# Altium PCB ProPrj_Project Ignis_2026-06-03(1).PcbDoc (part 2 of 2)
Units mm, origin at the board's own origin, x right, y up, seen from the top; angles counter-clockwise.
Board outline 152.4 x 101.6 mm, 18 copper layers (F.Cu, F.Mask, B.Cu, B.Mask, F.SilkS, B.SilkS, F.Adhes, B.Adhes, F.Paste, B.Paste, Dwgs.User, Cmts.User, Eco1.User, Eco2.User, Edge.Cuts, Margin, B.CrtYd, F.CrtYd); 71 components, 0 nets, 328 pads, 147 vias.
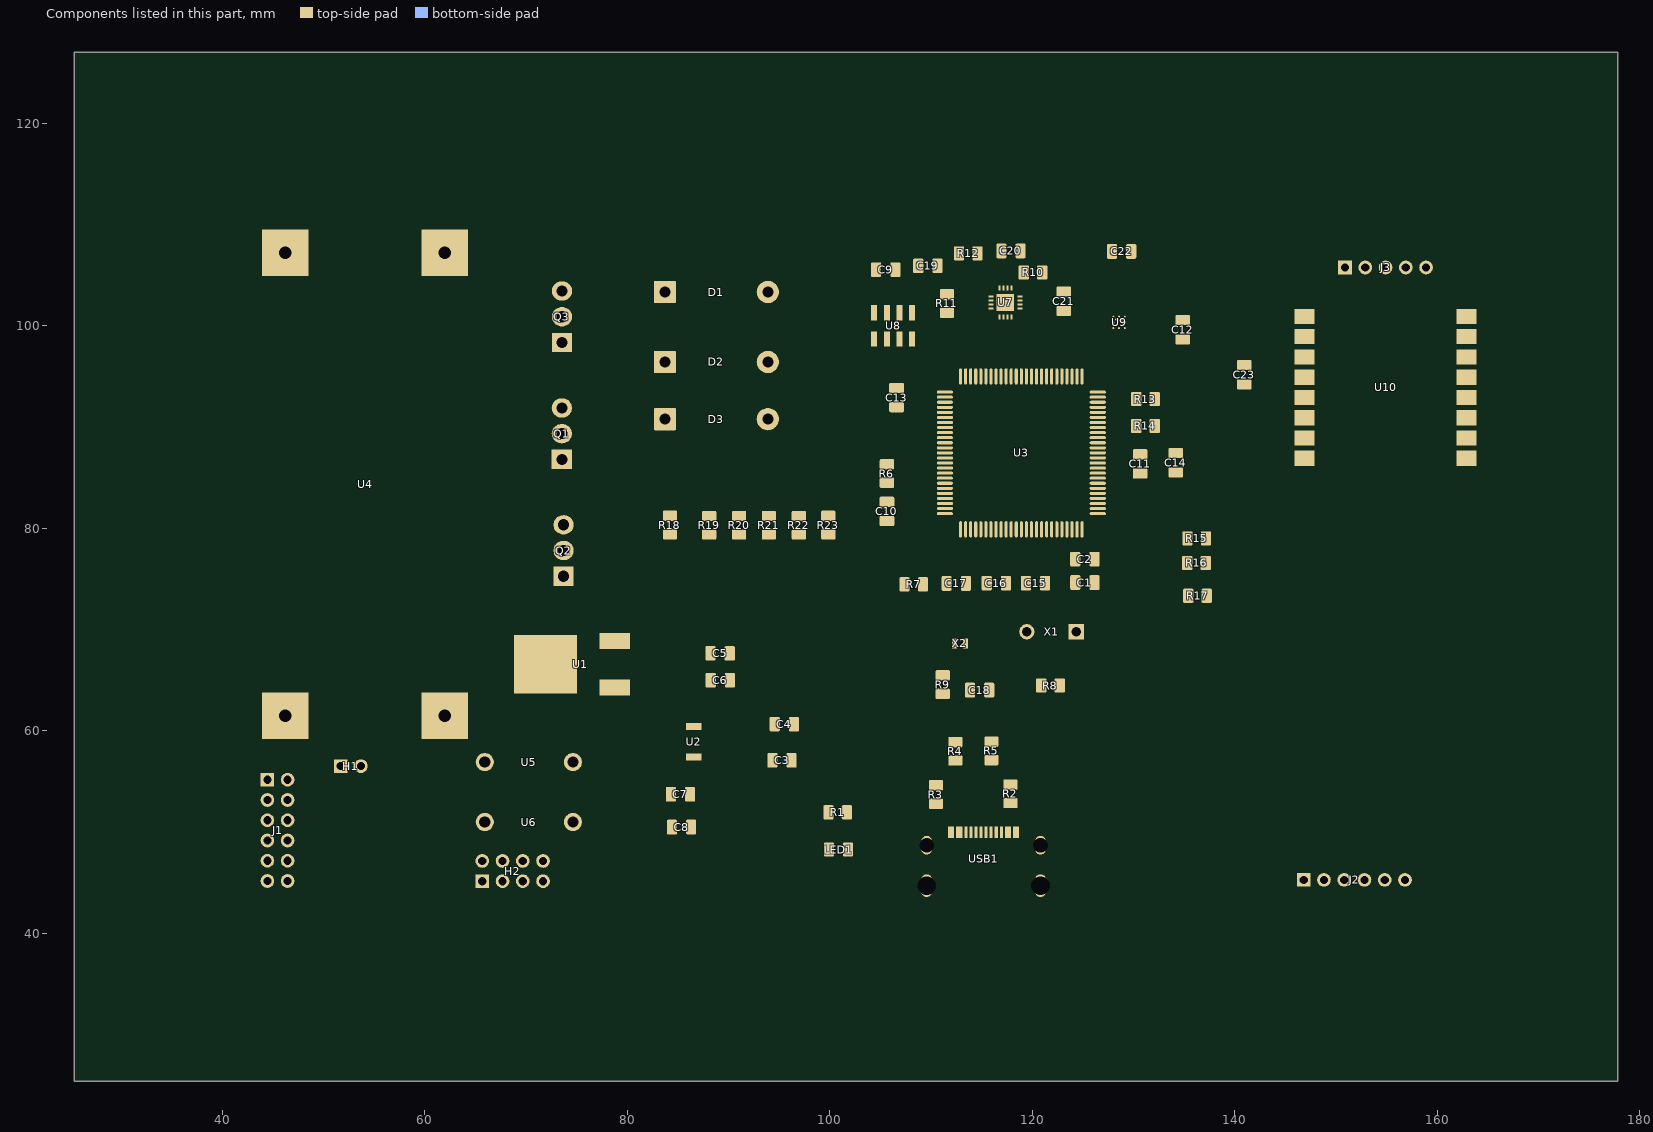
[diagram p8: the components of this part, seen from the top]

## Part data
C1 C2 C3 C4 C5 C6 C7 C8 C9 C10 C11 C12 C13 C14 C15 C16 C17 C18 C19 C20 C21 C22 C23: library part C_0805_2012Metric, "Capacitor SMD 0805 (2012 Metric), square (rectangular) end terminal, IPC-7351 nominal, (Body size source: IPC-SM-782 page 76, https://www.pcb-3d.com/wordpress/wp-content/uploads/ipc-sm-782a_amendment_1_and_2.pdf, https://docs.google.com/spreadsheets/d/1BsfQQcO9C6DZCsRaXUlFlo91Tg2WpOkGARC1WS5S8t0/edit?usp=sharing)", KiLib_Generator=SMD_2terminal_chip_molded
D1 D2 D3: library part D_DO-41_SOD81_P10.16mm_Horizontal, "Diode, DO-41_SOD81 series, Axial, Horizontal, pin pitch=10.16mm, length*diameter=5.2*2.7mm^2, https://www.diodes.com/assets/Package-Files/DO-41-Plastic.pdf", Datasheet=http://www.vishay.com/docs/88503/1n4001.pdf, Description="1000V 1A General Purpose Rectifier Diode, DO-41", KiLib_Generator=diode/THT, Sim.Device=D, Sim.Pins="1=K 2=A", ki_fp_filters=D*DO?41*
H1: library part PinHeader_1x02_P2.00mm_Vertical, "Through hole straight pin header, 1x02, 2.00mm pitch, single row", Manufacturer Part=PZ254V-11-02P, Manufacturer=XFCN(兴飞), LCSC Part Name="1x2P 间距:2.54mm 方针 直插", Datasheet=https://item.szlcsc.com/datasheet/PZ254V-11-02P/502957.html, Description="Pin Structure:1x2P Pitch:2.54mm Row Spacing:- Circluar Pins/Square Pins:Pin Header Mounting Type:Through Hole Number of Rows:1 Number of Pins:2P Current Rating:3A Voltage Rating (Max):250V Length of Mating Pin:6mm Insulation Height:2.5mm Length of End Con", KiLib_Generator=connector/pin_header_socket, Supplier Part=C492401, Supplier=LCSC
H2: library part PinHeader_2x04_P2.00mm_Vertical, "Through hole straight pin header, 2x04, 2.00mm pitch, double rows", Manufacturer Part=PZ254V-12-8P, Manufacturer=XFCN(兴飞), LCSC Part Name="2x4P 间距:2.54mm 方针 直插", Datasheet=https://item.szlcsc.com/datasheet/PZ254V-12-8P/502977.html, Description="Pin Structure:2x4P Pitch:2.54mm Row Spacing:2.54mm Circluar Pins/Square Pins:Pin Header Mounting Type:Through Hole Number of Rows:2 Number of Pins:8P Current Rating:- Voltage Rating (Max):- Length of Mating Pin:6mm Insulation Height:2.5mm Length of End Co", KiLib_Generator=connector/pin_header_socket, Supplier Part=C492421, Supplier=LCSC
J1: library part PinHeader_2x06_P2.00mm_Vertical, "Through hole straight pin header, 2x06, 2.00mm pitch, double rows", Description="Generic connector, double row, 02x06, top/bottom pin numbering scheme (row 1: 1...pins_per_row, row2: pins_per_row+1 ... num_pins), script generated (kicad-library-utils/schlib/autogen/connector/)", KiLib_Generator=connector/pin_header_socket, ki_fp_filters=Connector*:*_2x??_*
J2: library part PinHeader_1x06_P2.00mm_Vertical, "Through hole straight pin header, 1x06, 2.00mm pitch, single row", Description="Generic connector, single row, 01x06, script generated", KiLib_Generator=connector/pin_header_socket, ki_fp_filters=Connector*:*_1x??_*
J3: library part PinHeader_1x05_P2.00mm_Vertical, "Through hole straight pin header, 1x05, 2.00mm pitch, single row", Description="Generic connector, single row, 01x05, script generated", KiLib_Generator=connector/pin_header_socket, ki_fp_filters=Connector*:*_1x??_*
LED1: library part LED_0805_2012Metric, "LED SMD 0805 (2012 Metric), square (rectangular) end terminal, IPC-7351 nominal, (Body size source: https://docs.google.com/spreadsheets/d/1BsfQQcO9C6DZCsRaXUlFlo91Tg2WpOkGARC1WS5S8t0/edit?usp=sharing)", KiLib_Generator=SMD_2terminal_chip_molded
Q1 Q2 Q3: library part TO-220-3_Vertical, "TO-220-3, Vertical, RM 2.54mm, see https://www.vishay.com/docs/66542/to-220-1.pdf", Datasheet=http://www.irf.com/product-info/datasheets/data/irlz44n.pdf, Description="47A Id, 55V Vds, 22mOhm Rds Single N-Channel HEXFET Power MOSFET, TO-220AB", KiLib_Generator=package/TO_SOT/THT, ki_fp_filters=TO?220*
R1 R2 R3 R4 R5 R6 R7 R8 R9 R10 R11 R12 R13 R14 R15 R16 R17 R18 R19 R20 R21 R22 R23: library part R_0805_2012Metric, "Resistor SMD 0805 (2012 Metric), square (rectangular) end terminal, IPC-7351 nominal, (Body size source: IPC-SM-782 page 72, https://www.pcb-3d.com/wordpress/wp-content/uploads/ipc-sm-782a_amendment_1_and_2.pdf)", KiLib_Generator=SMD_2terminal_chip_molded
  R18 R19 R20 R21 R22 R23: Description=Resistor
U1: library part TO-252-2_L6.6-W5.6-P2.3-LS9.7, JLC_3DModel_Q=eec660cf81bf4a74bb3c7ab29ad977d9, JLC_3D_Size="6.6 9.7", Manufacturer Part=AMS1117-3.3, Manufacturer=YONGYUTAI(永裕泰), Datasheet=https://item.szlcsc.com/datasheet/AMS1117-3.3/43231650.html, Description="Output Type:Fixed Voltage - Supply:15V Output Voltage:3.3V Output Voltage:3.3V Output Current:800mA Power Supply Rejection Ratio (PSRR):75dB@(120Hz) Voltage Dropout:1.25V@(1A) standby current:- Noise:0.003%Vout Features:Over Current Protection；Over Temper", Supplier Part=C41414107, Supplier=LCSC, LCSC Part Name=AMS1117-3.3
U2: library part SOT-89-3_L4.5-W2.4-P1.50-LS4.0-BR, JLC_3DModel_Q=3e173860bf1340a4970e0d4da7c38a29, JLC_3D_Size="4.5 4.1", Manufacturer Part=AMS1117-5.0, Manufacturer=KUU, Datasheet=https://item.szlcsc.com/datasheet/AMS1117-5.0/44309945.html, Description="Output Type:Fixed Voltage - Supply:12V Output Voltage:5V Output Voltage:5V Output Current:800mA Power Supply Rejection Ratio (PSRR):- Voltage Dropout:1.3V@(0.8A) standby current:2mA Noise:0.003%Vout Features:Thermal Shutdown Operating Temperature:-40°C~+85", Supplier Part=C42387175, Supplier=LCSC, LCSC Part Name=AMS1117-5.0
U3: library part LQFP-100_L14.0-W14.0-P0.50-LS16.0-BL, JLC_3DModel_Q=dcc1c7ac602c4975b215b1407bde4684, JLC_3D_Size="16 16", Manufacturer Part=STM32G473VET6, Manufacturer=ST(意法半导体), LCSC Part Name="带DSP和FPU的170MHz主流ARM Cortex-M4 MCU，具有512 KB Flash存储器、数学加速器和高模拟电平集成", Datasheet=https://item.szlcsc.com/datasheet/STM32G473VET6/778077.html, Description="CPU Core:ARM-M4 CPU Maximum Speed:170MHz Program Storage Size:512KB Program Memory Type:FLASH Number of I/O:86 ADC (Bit):12bit DAC (Bit):12bit Voltage - Supply:1.71V~3.6V Voltage - Supply:1.71V~3.6V Applications:-", Supplier Part=C730122, Supplier=LCSC
U4: library part DC_DC_LM2596_small
U5 U6: library part DO-41_BD2.4-L4.7-P8.70-D0.8-FD, JLC_3DModel_Q=39d8e4572d564e62a86d2224fc908dd8, JLC_3D_Size="9.5 2.3985", Manufacturer Part=IN5819, Supplier Part=C9900005587, Supplier=LCSC, LCSC Part Name=IN5819
U7: library part QFN-24_L3.0-W3.0-P0.40-BL-EP, JLC_3DModel_Q=45d28e8706e7498c95f25f3d412d7c49, JLC_3D_Size="3 3", Manufacturer Part=MPU-6500, Manufacturer="TDK InvenSense(应美盛)", Datasheet=https://item.szlcsc.com/datasheet/MPU-6500/51287.html, Description="Accelerometer Sensing Axis:X,Y,Z Acceleration Measurement Range (MAX):±16g Acceleration Measurement Range (MAX):±16g Gyroscope Sensing Axis:X,Y,Z Gyroscope Measurement Range (MAX):±2000dps Gyroscope Measurement Range (MAX):±2000dps Sensor Type:IMU (accele", Supplier Part=C50278, Supplier=LCSC, LCSC Part Name=MPU-6500
U8: library part SENSORS-SMD_MS5611-01BA03, JLC_3DModel_Q=672fc546baaf493a9f668044721589aa, JLC_3D_Size="5 3", Manufacturer Part=MS561101BA03-50, Manufacturer="TE Connectivity(泰科电子)", LCSC Part Name=气压传感器，带不锈钢帽, Datasheet=https://item.szlcsc.com/datasheet/MS561101BA03-50/16320.html, Description="Pressure range:1Kpa~1.2bar Pressure range:1Kpa~1.2bar Voltage - Supply:1.8V~3.6V Voltage - Supply:1.8V~3.6V Standby Current:140nA Interface:SPI；I2C Module:Yes Absolute Accuracy:150pa Relative Accuracy:- Features:On-chip temperature output；Standby mode；Int", Supplier Part=C15639, Supplier=LCSC
U9: library part WLCSP-12_L1.6-W1.6_BMM150, JLC_3DModel_Q=e29c6614a3ad4a06ae6fc9d5a7a1f09f, JLC_3D_Size="1.56 1.56", Manufacturer Part=BMM150, Manufacturer=Bosch(博世), LCSC Part Name="三轴地磁式传感器 停产", Datasheet=https://item.szlcsc.com/datasheet/BMM150/183067.html, Description="Magnetic Sensing Range(X,Y):±1.3mT Magnetic Sensing Range(X,Y):±1.3mT Magnetic Sensing Range(Z):±2.5mT Magnetic Sensing Range(Z):±2.5mT Output bit:- Interface Type:SPI；I2C Voltage - Supply:1.62V~3.6V Voltage - Supply:1.62V~3.6V Current - Supply:- Operatin", Supplier Part=C171681, Supplier=LCSC
U10: library part Ai-Thinker-Ra-01-LoRa, "Ai Thinker Ra-01 LoRa", Datasheet=http://wiki.ai-thinker.com/_media/lora/docs/c048ps01a1_ra-02_product_specification_v1.1.pdf, Description="Ai-Thinker Ra-02 410-525 MHz LoRa Module, SPI interface, U.FL antenna connector", ki_fp_filters=Ai?Thinker?Ra?01*
USB1: library part TE_2340901-1, Manufacturer Part=USBC1-AF-046, Manufacturer=CHIN-BAN(勤本), LCSC Part Name="Type-C 母 沉板", Datasheet=https://item.szlcsc.com/datasheet/USBC1-AF-046/52896317.html, Description="Connector Type:Type-C Protocol Standard:USB 3.1 Gender:Female Mounting Type:Recessed Mount Number of Contacts:16P Number of Ports:1 Current Rating-Power:5A Connect-Disconnect Life:10,000 Cycles Length:6.5mm Detection color:Black Operating Temperature:-30°C", Supplier Part=C50305660, Supplier=LCSC
X1: library part HC-49US_L11.5-W4.5-P4.88, JLC_3DModel_Q=a8e34f6c394c4d60ace7720f62d1ccdf, JLC_3D_Size="10.9855 4.501", Manufacturer Part=6BS08000F20UCG, Manufacturer=SJK(晶科鑫), LCSC Part Name="8MHz ±20ppm 20pF", Datasheet=https://atta.szlcsc.com/upload/public/pdf/source/20220727/A799E7302D7A178404B6CABC66F8558B.pdf, Description="Crystal Type: Frequency: Frequency Tolerance: Frequency Tolerance: Frequency Stability:±30ppm Frequency Stability:±30ppm Load Capacitance: Operating Temperature: Operating Temperature:", Supplier Part=C252288, Supplier=LCSC
X2: library part ABS0532768KHZ6T, "ABS05-32.768KHZ-6-T-2", Manufacturer Part=9H03200028, Manufacturer=TXC(台湾晶技), LCSC Part Name="32.768kHz ±20ppm 7pF", Datasheet=https://atta.szlcsc.com/upload/public/pdf/source/20200108/C409339_4C8718E4B1BEC1560F6B97CF419D35BF.pdf, Description="Crystal Type:SMD Crystal Resonator Frequency: Frequency Tolerance: Frequency Tolerance: Load Capacitance: Equivalent Series Resistance (ESR):90kΩ Operating Temperature: Operating Temperature:", Supplier Part=C409339, Supplier=LCSC

## Via types
v1: diameter 0.6, hole 0.3, F.Cu to B.Cu, tented both sides, 147 vias

## Nets (pads, with @x,y where several pads share a name; then routed paths per layer and width w, separated by ;. In a path a pad name is that pad's centre, name@x,y a point inside that pad or via, vN(x,y) a via of type N, cw(c..) or ccw(c..) an arc to the next point about the centre after c; other vN are vias at no path point)
pads on no net: C1.1 C1.2 C2.1 C2.2 C3.1 C3.2 C4.1 C4.2 C5.1 C5.2 C6.1 C6.2 C7.1 C7.2 C8.1 C8.2 C9.1 C9.2 C10.1 C10.2 C11.1 C11.2 C12.1 C12.2 C13.1 C13.2 C14.1 C14.2 C15.1 C15.2 C16.1 C16.2 C17.1 C17.2 C18.1 C18.2 C19.1 C19.2 C20.1 C20.2 C21.1 C21.2 C22.1 C22.2 C23.1 C23.2 D1.1 D1.2 D2.1 D2.2 D3.1 D3.2 H1.1 H1.2 H2.1 H2.2 H2.3 H2.4 H2.5 H2.6 H2.7 H2.8 J1.1 J1.2 J1.3 J1.4 J1.5 J1.6 J1.7 J1.8 J1.9 J1.10 J1.11 J1.12 J2.1 J2.2 J2.3 J2.4 J2.5 J2.6 J3.1 J3.2 J3.3 J3.4 J3.5 LED1.1 LED1.2 Q1.1 Q1.2 Q1.3 Q2.1 Q2.2 Q2.3 Q3.1 Q3.2 Q3.3 R1.1 R1.2 R2.1 R2.2 R3.1 R3.2 R4.1 R4.2 R5.1 R5.2 R6.1 R6.2 R7.1 R7.2 R8.1 R8.2 R9.1 R9.2 R10.1 R10.2 R11.1 R11.2 R12.1 R12.2 R13.1 R13.2 R14.1 R14.2 R15.1 R15.2 R16.1 R16.2 R17.1 R17.2 R18.1 R18.2 R19.1 R19.2 R20.1 R20.2 R21.1 R21.2 R22.1 R22.2 R23.1 R23.2 U1.1 U1.2 U1.3 U2.1 U2.3 U3.1 U3.2 U3.3 U3.4 U3.5 U3.6 U3.7 U3.8 U3.9 U3.10 U3.11 U3.12 U3.13 U3.14 U3.15 U3.16 U3.17 U3.18 U3.19 U3.20 U3.21 U3.22 U3.23 U3.24 U3.25 U3.26 U3.27 U3.28 U3.29 U3.30 U3.31 U3.32 U3.33 U3.34 U3.35 U3.36 U3.37 U3.38 U3.39 U3.40 U3.41 U3.42 U3.43 U3.44 U3.45 U3.46 U3.47 U3.48 U3.49 U3.50 U3.51 U3.52 U3.53 U3.54 U3.55 U3.56 U3.57 U3.58 U3.59 U3.60 U3.61 U3.62 U3.63 U3.64 U3.65 U3.66 U3.67 U3.68 U3.69 U3.70 U3.71 U3.72 U3.73 U3.74 U3.75 U3.76 U3.77 U3.78 U3.79 U3.80 U3.81 U3.82 U3.83 U3.84 U3.85 U3.86 U3.87 U3.88 U3.89 U3.90 U3.91 U3.92 U3.93 U3.94 U3.95 U3.96 U3.97 U3.98 U3.99 U3.100 U4.1 U4.2 U4.3 U4.4 U5.1 U5.2 U6.1 U6.2 U7.2 U7.3 U7.4 U7.5 U7.8 U7.9 U7.10 U7.11 U7.14 U7.15 U7.16 U7.17 U7.20 U7.21 U7.22 U7.23 U7.25 U8.1 U8.2 U8.3 U8.4 U8.5 U8.6 U8.7 U8.8 U9.A1 U9.A3 U9.A5 U9.B2 U9.B4 U9.C1 U9.C5 U9.D2 U9.D4 U9.E1 U9.E3 U9.E5 U10.1 U10.2 U10.3 U10.4 U10.5 U10.6 U10.7 U10.8 U10.9 U10.10 U10.11 U10.12 U10.13 U10.14 U10.15 U10.16 USB1.A1/B12 USB1.A4/B9 USB1.A5 USB1.A6 USB1.A7 USB1.A8 USB1.B1/A12 USB1.B4/AP USB1.B5 USB1.B6 USB1.B7 USB1.B8 USB1.SH1 USB1.SH2 USB1.SH3 USB1.SH4 X1.1 X1.2 X2.1 X2.2
copper on no net: | length 3153.2
  F.Cu w0.1: v1(111.394,104.518) 113.318,104.518 114.934,102.902 115.907,102.902 ; 111.562,103.108 114.304,103.108 114.91,102.502 115.907,102.502 ; v1(113.02,101.542) 113.181,101.702 115.907,101.702 ; v1(114.316,102.318) 114.532,102.102 115.907,102.102 ; 116.295,99.706 116.335,99.746 116.335,100.874 ; v1(116.495,77.952) 117.368,77.952 118.412,78.996 118.412,79.896 ; v1(117.405,65.702) 117.405,64.622 118.161,63.866 v1(119.8,63.866) ; 118.335,100.874 118.44,100.77 118.44,100.317 118.665,100.092 118.965,100.392 119.533,100.392 119.783,100.142 121.495,100.142 ; 118.763,101.302 119.25,101.302 v1(119.616,100.936) ; 118.763,101.702 119.274,101.702 119.49,101.486 120.151,101.486 121.495,100.142 ; 118.763,102.502 119.215,102.502 119.888,101.829 120.211,101.829 v1(120.41,102.028) ; 118.763,102.902 119.495,102.902 119.935,103.342 119.945,103.342 v1(120.006,103.28) ; 118.763,103.302 118.925,103.302 v1(119.595,103.972) ; v1(119.305,99.842) 121.069,99.842 v1(121.325,99.586) ; 123.112,101.466 121.788,100.142 121.495,100.142 ; v1(126.25,100.436) 126.364,100.323 127.993,100.323 ; v1(126.53,101.185) 126.53,101.177 126.525,101.172 126.905,100.592 128.276,100.606 ; 127.325,102.385 127.325,101.557 127.993,100.889 ; 128.559,99.757 128.634,99.682 129.05,99.682 129.125,99.757 129.205,99.837 129.205,99.852 ; 128.559,100.889 129.045,101.375 v1(129.045,101.785) ; 129.125,100.323 129.205,100.243 129.205,99.852 ; 129.125,100.889 130.492,100.889 130.825,101.222 ; v1(131.592,99.255) 130.995,99.852 129.205,99.852 ; v1(133.875,105.982) 134.805,106.912 157.715,106.912 158.875,105.752
  F.Cu w0.2: 44.465,45.172 43.488,46.149 43.488,50.195 44.465,51.172 ; 44.465,53.172 46.465,51.172 48.791,48.846 69.42,48.846 72.811,52.237 75.126,52.237 75.837,51.526 75.837,49.848 ; 46.237,61.482 48.825,61.482 51.412,58.894 68.362,58.894 v1(71.622,55.634) 72.9,56.912 74.635,56.912 ; 46.237,107.202 48.825,107.202 51.412,109.79 v1(72.198,109.79) ; 51.695,56.512 52.672,56.512 52.672,56.146 54.058,54.759 v1(66.604,54.759) ; v1(53.493,50.119) 54.106,49.507 v1(68.82,49.507) 71.951,52.638 84.302,52.638 ; v1(53.672,64.623) 54.205,64.09 v1(58.066,64.09) 60.548,66.572 71.925,66.572 71.925,69.774 76.617,74.466 107.382,74.466 107.476,74.56 107.476,77.591 106.193,78.874 106.193,80.164 106.193,79.29 106.128,79.225 v1(105.624,79.225) ; 53.695,56.512 55.154,57.971 v1(58.717,57.971) 58.815,58.069 v1(62.016,58.069) ; v1(54.312,47.206) 57.343,44.175 68.662,44.175 ; v1(58.246,78.971) 63.301,84.026 90.608,84.026 99.528,92.946 111.362,92.946 ; 61.985,107.202 102.821,107.202 ; 65.685,45.152 66.662,45.152 66.662,45.518 67.272,46.129 68.09,46.129 68.662,45.557 68.662,44.175 ; v1(71.335,91.588) 74.411,94.663 109.043,94.663 110.26,93.446 111.362,93.446 ; 71.685,47.152 73.141,47.152 75.837,49.848 ; v1(74.001,61.113) 74.684,60.43 86.565,60.43 ; 74.635,50.992 72.144,50.992 68.708,47.556 68.708,46.748 69.281,46.175 74.557,46.175 v1(77.605,49.223) 78.554,48.274 99.925,48.274 100.817,49.165 v1(100.817,50.343) ; v1(78.672,66.08) 87.355,66.08 88.222,65.213 ; 78.772,64.272 80.574,64.272 80.91,63.936 89.079,63.936 90.142,64.999 94.482,60.659 ; 78.773,68.872 78.815,68.83 v1(78.815,68.034) ; 87.872,52.059 86.312,50.499 85.28,49.468 80.884,49.468 80.503,49.848 75.837,49.848 ; 88.242,64.999 88.232,65.009 ; 88.242,64.999 88.232,65.009 ; v1(88.409,58.812) 88.291,58.929 83.852,58.929 84.302,58.479 84.302,53.729 84.302,52.638 ; 90.142,64.999 90.142,67.629 90.132,67.639 ; v1(91.513,67.789) 94.561,70.838 125.209,70.838 125.44,70.607 v1(151.759,70.607) ; 94.332,57.079 93.981,57.43 ; 94.562,60.659 94.482,60.659 ; 96.232,57.079 96.462,57.309 96.462,60.659 101.479,60.659 v1(105.624,64.805) ; v1(100.972,98.206) 102.2,96.977 v1(105.902,96.977) 109.788,96.977 v1(112.016,94.749) 112.016,94.603 112.725,93.894 112.912,93.894 112.912,94.996 ; 101.693,51.954 101.8,51.846 101.8,48.674 ; 101.8,48.274 101.8,48.474 ; v1(102.798,98.223) 103.397,97.624 104.382,97.624 104.382,98.676 104.382,101.276 104.382,103.565 105.335,104.518 105.505,104.518 ; v1(104.185,83.542) 104.661,83.542 105.922,82.281 105.977,82.281 ; v1(105.007,103.331) 105.007,100.371 105.651,99.727 106.882,99.727 ; v1(105.011,93.86) 105.015,93.856 106.592,93.856 ; 105.632,84.496 106.182,83.946 111.362,83.946 ; 105.642,82.616 105.977,82.281 ; 106.193,80.165 105.642,80.716 109.53,80.716 110.26,81.446 111.362,81.446 112.464,81.446 112.693,81.216 ; 106.475,105.532 106.475,104.942 106.899,104.518 109.362,104.518 ; 106.592,91.956 105.632,90.996 105.632,86.321 105.674,86.278 v1(108.75,86.278) ; 106.882,98.676 106.882,99.727 ; 106.882,101.276 108.251,101.276 ; v1(107.521,48.745) 102.951,44.175 68.662,44.175 ; 108.132,98.676 108.132,97.624 112.1,97.624 v1(112.724,98.248) ; 108.132,101.276 108.251,101.276 ; 108.735,105.912 108.115,106.532 108.115,107.202 ; 109.207,74.466 109.207,74.491 109.545,74.829 v1(109.545,76.052) 109.545,76.765 110.142,77.362 116.129,77.362 116.649,76.842 117.26,76.842 119.412,78.994 119.412,79.896 ; 110.485,52.798 112.42,50.864 113.935,50.864 113.935,49.987 ; 110.485,54.623 110.214,54.351 ; 110.635,105.912 110.635,105.277 v1(111.394,104.518) 109.362,104.518 ; 111.152,63.656 111.522,64.026 113.842,64.026 113.842,66.088 115.543,67.789 ; 111.152,65.481 111.689,66.017 111.689,68.631 112.39,68.631 113.973,70.214 v1(115.731,70.214) ; 111.362,81.946 106.312,81.946 105.977,82.281 ; 111.362,85.446 113.36,85.446 116.594,88.68 v1(120.315,88.68) ; 111.542,74.556 113.748,76.762 v1(115.88,76.762) ; 111.562,101.283 110.495,100.217 106.459,100.217 105.632,101.043 105.632,101.276 105.632,102.327 105.632,104.391 105.505,104.518 102.821,107.202 ; 112.398,57.066 113.409,58.077 113.409,59.388 112.847,59.95 v1(112.767,59.95) ; v1(112.756,100.132) 113.182,99.706 116.295,99.706 v1(117.272,99.706) ; 113.365,107.751 111.684,107.751 111.135,107.202 108.115,107.202 ; 113.412,94.996 113.412,96.097 113.857,96.543 125.692,96.543 126.716,95.519 126.716,95.036 ; 113.442,74.556 115.462,74.556 115.492,74.586 116.52,73.558 120.234,73.558 121.262,74.586 124.182,74.586 124.242,74.646 124.242,76.526 123.812,76.956 ; v1(113.716,106.078) 113.716,106.277 114.585,107.145 ; v1(113.778,93.037) 113.912,93.171 113.912,94.996 ; v1(113.787,56.975) 113.787,57.242 115.477,58.933 115.955,58.933 ; 114,68.631 114.701,68.631 115.543,67.789 ; 114.412,94.996 114.412,92.56 v1(114.741,92.231) ; 114.435,49.987 114.435,52.242 115.935,53.742 ; v1(114.665,57.242) 114.799,57.108 115.955,57.108 ; 114.912,94.996 114.912,93.894 117.469,93.894 v1(117.687,93.676) ; 114.935,49.987 115.435,49.987 v1(115.285,51.912) ; 115.412,79.896 115.412,80.997 112.912,80.997 112.693,81.216 ; 115.412,94.996 115.412,96.097 125.186,96.097 v1(125.76,95.523) ; v1(115.505,83.302) 117.478,85.275 v1(123.253,85.275) 123.924,85.946 126.462,85.946 ; 115.742,64.026 116.181,64.026 v1(117.739,62.468) ; 115.935,49.987 115.935,53.742 ; v1(116.356,55.694) 112.249,55.694 111.355,56.587 111.355,57.848 111.876,58.369 ; v1(116.393,53.972) 116.165,53.972 115.935,53.742 ; 116.412,79.896 116.412,81.895 117.057,82.54 v1(117.596,82.54) ; 116.912,79.896 116.912,81.432 v1(117.095,81.615) ; 116.935,49.987 116.935,51.737 117.835,52.637 117.835,52.868 ; 116.942,107.386 116.942,106.776 v1(118.412,105.306) 118.826,105.306 ; v1(116.991,60.567) 112.475,60.567 107.89,55.982 107.89,54.125 ; v1(117.375,67.789) 115.543,67.789 ; 117.392,74.586 117.392,75.869 v1(118.873,77.35) ; v1(118.12,81.494) 118.617,80.997 118.912,80.997 118.912,79.896 ; 118.412,94.996 118.412,93.894 119.86,92.446 126.462,92.446 127.894,92.446 v1(128.694,93.246) ; 118.912,94.996 118.912,94.203 119.982,93.132 v1(124.018,93.132) ; v1(119.033,76.354) 119.635,76.956 123.812,76.956 ; 119.155,105.261 119.11,105.306 118.826,105.306 ; 119.362,74.586 119.362,74.802 v1(120.312,75.752) v1@120.459,75.899 ; v1(119.8,63.866) 120.41,64.476 120.879,64.476 120.879,68.358 119.452,69.786 122.47,69.786 v1(122.907,70.223) ; 119.912,79.896 119.912,78.794 120.446,78.26 v1(123.932,78.26) ; v1(120.774,103.054) 120.894,102.934 120.894,102.481 121.12,102.254 121.335,102.254 122.446,103.366 123.112,103.366 ; v1(121.305,103.652) 121.888,103.652 121.955,103.719 121.955,103.852 ; v1(121.462,105.526) 121.244,105.526 121.012,105.294 ; v1(121.909,101.898) 121.815,101.991 121.815,102.154 122.077,102.416 124.776,102.416 125.438,103.077 130.674,103.077 131.101,102.651 151.774,102.651 154.875,105.752 ; 122.705,64.476 124.334,66.105 124.334,69.786 ; 123.112,101.466 123.274,101.466 v1(124.161,100.579) ; v1(123.182,99.656) 124.142,99.656 v1(125.162,100.676) ; v1(123.212,108.831) 124.708,107.336 127.862,107.336 ; v1(123.253,97.662) 123.253,98.986 ; v1(123.882,106.276) 124.13,106.276 v1@124.152,106.298 ; 123.912,79.896 123.912,80.997 121.759,83.15 117.022,83.15 116.545,82.673 115.279,82.673 114.903,83.048 ; 124.232,76.956 123.812,76.956 ; 124.412,79.896 124.412,78.794 124.955,78.251 ; v1(125.452,104.846) 123.313,104.846 v1(123.197,104.961) 122.684,104.961 121.955,104.232 121.955,103.852 ; 126.132,76.956 126.132,74.656 126.142,74.646 123.765,72.269 110.938,72.269 ; v1(126.203,78.26) 124.963,78.26 124.955,78.251 ; 126.462,81.446 127.564,81.446 127.564,81.356 134.441,74.479 137.615,74.479 137.847,74.247 153.878,74.247 v1(157.114,71.012) ; 126.462,81.946 127.888,81.946 v1(128.192,81.642) ; 126.462,82.446 128.242,82.446 134.112,76.576 135.302,76.576 ; 126.462,82.946 125.36,82.946 125.36,81.213 133.238,73.336 135.397,73.336 ; 126.462,84.446 145.7,84.446 v1(146.389,85.135) ; 126.462,84.946 127.564,84.946 127.564,85.019 128.962,86.417 v1(144.166,86.417) v1(144.166,90.48) 146.608,92.922 146.875,92.922 ; 126.462,86.946 127.564,86.946 127.564,86.696 ; 126.462,92.946 124.205,92.946 v1(124.018,93.132) ; v1(127.372,95.036) 126.716,95.036 ; v1(127.642,98.116) 126.82,98.116 v1(126.303,98.632) 126.303,99.757 ; v1(127.852,90.839) 128.121,91.108 130.751,91.108 131.075,90.784 131.075,89.427 130.642,88.994 130.642,87.306 ; v1(127.879,96.414) 129.023,95.271 142.732,95.271 145.132,97.67 v1(145.132,97.798) ; 128.276,100.04 127.993,99.757 126.303,99.757 ; v1(128.703,89.862) 128.947,90.106 130.26,90.106 ; v1(129.135,85.731) 130.317,85.731 130.642,85.406 130.752,85.516 134.162,85.516 ; v1(129.561,82.013) 133.618,77.957 136.098,77.957 137.147,79.006 138.076,79.935 v1(139.159,79.935) ; v1(129.662,102.456) v1@129.662,102.385 ; 129.762,107.336 129.762,106.298 ; 130.252,92.756 130.252,93.034 124.3,98.986 123.253,98.986 ; 132.077,92.756 132.077,90.113 132.085,90.106 ; v1(132.362,103.276) 132.362,104.764 ; 135.322,79.006 136.856,80.54 160.179,80.54 v1(160.407,80.311) ; 137.222,73.336 150.426,73.336 v1(152.987,70.774) ; v1(137.437,100.926) 135.213,100.926 134.842,100.556 131.491,100.556 130.825,101.222 v1@129.662,102.385 ; v1(137.669,87.416) 134.162,87.416 130.752,87.416 130.642,87.306 ; v1(138.015,74.973) 137.127,75.861 137.127,76.576 137.908,77.357 159.062,77.357 v1(164.305,82.599) ; v1(139.564,93.847) 139.922,94.206 140.922,94.206 142.327,94.206 145.043,96.922 146.875,96.922 ; v1(142.92,93.422) 144.42,94.922 146.875,94.922 ; v1(143.139,96.572) 142.672,96.106 140.922,96.106 136.209,96.106 v1(134.89,97.425) 134.842,97.473 134.842,98.656 135.108,98.922 146.875,98.922 146.875,100.922 162.875,100.922 ; 146.795,45.282 127.246,45.282 117.835,54.693 110.555,54.693 110.213,54.351 ; v1(148.161,85.893) 160.961,85.893 v1(161.04,85.971) 161.573,86.505 161.573,86.922 162.875,86.922 ; v1(149.95,47.428) 154.649,47.428 156.795,45.282 ; 152.875,105.752 151.887,104.764 132.362,104.764 ; v1(159.655,91.845) 159.655,97.004 161.573,98.922 162.875,98.922 ; v1(161.113,92.515) 161.52,92.922 162.875,92.922 ; 162.875,96.922 162.875,94.922 164.177,94.922 164.177,94.62 v1(164.81,93.987) ; 84.302,52.638 84.302,50.609 84.357,50.554 ; 84.357,50.554 84.412,50.499 84.357,50.554 ; 88.222,65.213 88.222,67.649 92.677,72.104 110.773,72.104 ; 88.222,65.213 88.222,65.019 88.232,65.009 ; 90.132,67.639 90.122,67.649 90.132,67.639 ; 93.981,57.43 86.565,57.43 86.565,54.092 86.202,53.729 87.872,52.06 87.978,51.954 99.868,51.954 ; 93.981,57.43 93.981,60.159 94.482,60.659 ; 99.868,51.954 99.968,52.054 ; 99.868,51.954 99.968,52.054 ; 99.968,52.054 102.039,54.125 107.89,54.125 ; 101.8,48.674 101.8,48.474 101.8,48.674 ; 102.821,107.202 108.115,107.202 ; 106.882,99.727 111.684,99.727 112.425,98.986 123.253,98.986 ; 107.89,54.125 108.257,53.758 109.62,53.758 110.213,54.351 ; 108.251,101.276 108.371,101.276 109.467,102.371 109.362,102.477 109.362,104.518 ; 110.773,72.104 110.938,72.269 ; 110.773,72.104 110.938,72.269 ; 111.876,58.369 112.398,58.891 111.877,58.369 ; 112.693,81.216 114.517,83.039 114.842,83.039 114.851,83.048 114.903,83.048 ; 112.788,107.174 113.365,107.751 114.086,108.472 117.756,108.472 118.842,107.386 119.93,106.298 v1@124.152,106.298 ; 112.788,107.174 112.759,107.146 112.788,107.174 ; 114.903,83.048 114.903,85.677 v1(115.505,86.278) 115.672,86.446 126.462,86.446 127.564,86.446 127.564,86.696 ; 118.826,105.306 119.441,105.306 120.895,103.852 121.955,103.852 ; 121.012,105.294 120.979,105.262 121.012,105.294 ; 123.812,76.956 124.73,77.873 124.73,78.026 124.955,78.251 ; v1(124.018,93.132) 124.813,93.132 126.716,95.036 ; v1@124.152,106.298 129.762,106.298 ; v1(125.162,100.676) 126.081,99.757 126.303,99.757 ; v1(125.162,100.676) 126.871,102.385 127.325,102.385 v1@129.662,102.385 ; 127.564,86.696 128.008,87.139 128.807,87.139 ; 128.807,87.139 128.974,87.306 ; 128.807,87.139 128.974,87.306 ; 128.974,87.306 130.642,87.306 ; 129.762,106.298 130.828,106.298 132.362,104.764
  B.Cu w0.1: v1(112.724,98.248) 114.74,98.248 116.973,100.482 118.065,100.482 118.655,99.892 118.655,99.512 118.975,99.512 v1(119.305,99.842) ; v1(116.495,77.952) 116.495,66.612 v1(117.405,65.702) ; v1(117.272,99.706) 117.766,99.212 119.453,99.212 120.225,99.984 120.225,100.327 v1(119.616,100.936) ; v1(119.595,103.972) 119.865,104.242 119.865,108.602 120.644,109.381 125.096,109.381 126.53,107.947 v1(126.53,101.185) ; v1(120.006,103.28) 120.006,103.427 120.912,104.333 120.912,105.753 121.234,106.076 121.69,106.076 122.592,105.173 122.592,99.199 122.685,99.106 ; v1(120.315,88.68) 120.315,90.856 126.745,97.286 128.429,97.286 128.429,103.641 127.452,104.618 127.452,105.073 128.361,105.982 v1(133.875,105.982) ; v1(120.41,102.028) 120.498,102.028 120.795,101.731 120.964,101.731 121.615,102.382 121.615,102.832 121.855,103.072 121.855,105.133 v1(121.462,105.526) ; v1(121.325,99.586) 121.325,99.456 121.675,99.106 122.685,99.106 ; v1(126.25,100.436) 124.92,99.106 122.685,99.106 ; v1(129.045,101.785) 132.279,101.785 132.362,101.702
  B.Cu w0.2: 44.465,45.172 44.465,44.392 v1(44.955,43.902) ; 44.465,51.172 44.692,51.172 ; 44.465,53.172 43.484,52.191 43.484,48.153 44.465,47.172 46.465,45.172 ; v1(45.775,48.242) 46.465,48.932 46.465,49.172 44.692,50.945 44.692,51.172 ; 46.465,55.172 45.465,54.172 45.465,51.945 44.692,51.172 ; v1(54.312,47.206) 54.312,51.94 v1(54.467,52.095) ; v1(58.066,64.09) 58.066,53.376 65.29,46.152 68.685,46.152 69.685,47.152 ; v1(58.246,78.971) 59.317,77.9 59.317,58.896 63.045,55.168 63.045,49.792 65.685,47.152 ; v1(58.329,82.029) 61.985,78.374 61.985,61.482 61.985,58.894 62.016,58.863 v1(62.016,58.069) ; 65.935,56.912 66.604,56.243 v1(66.604,54.759) ; 67.685,47.152 67.685,87.938 v1(71.335,91.588) ; v1(68.82,49.507) 70.685,47.642 70.685,46.152 69.685,45.152 ; 71.685,45.152 71.685,47.152 ; v1(72.198,109.79) 78.815,103.173 v1(78.815,68.034) 78.815,66.223 v1(78.672,66.08) 78.672,65.784 v1(74.001,61.113) 73.387,60.499 73.387,52.24 74.635,50.992 ; v1(88.409,58.812) 88.409,64.685 v1(91.513,67.789) ; v1(100.817,50.343) 100.817,54.956 v1(101.495,55.634) ; v1(102.798,98.223) 105.011,96.01 v1(105.011,93.86) 105.011,84.017 104.536,83.542 v1(104.185,83.542) ; v1(105.624,64.805) v1(105.624,79.225) 105.624,83.153 v1(108.75,86.278) 112.016,89.544 v1(112.016,94.749) 111.424,95.341 111.424,98.8 v1(112.756,100.132) 111.394,101.494 v1(111.394,104.518) ; v1(107.521,48.745) 107.521,53.406 v1(108.515,54.4) 108.515,75.183 109.384,76.052 v1(109.545,76.052) ; v1(112.073,97.055) 112.073,97.597 v1(112.724,98.248) ; v1(112.767,59.95) 112.767,92.026 v1(113.778,93.037) ; v1(113.02,101.542) 113.02,105.382 v1(113.716,106.078) ; v1(113.787,56.975) 114.475,56.287 114.475,52.722 v1(115.285,51.912) ; v1(114.316,102.318) 114.316,104.527 ; v1(114.665,57.242) 114.665,92.155 v1(114.741,92.231) ; v1(114.905,105.116) 114.316,104.527 ; v1(115.505,83.302) 115.258,83.055 115.258,71.644 v1(115.455,71.447) 115.13,71.121 115.13,63.243 v1(116.657,61.716) 116.657,60.901 v1(116.991,60.567) 117.739,61.315 v1(117.739,62.468) 118.331,63.06 118.331,75.651 v1(119.033,76.354) ; v1(115.731,70.214) 116.06,70.543 116.06,76.582 v1(115.88,76.762) 115.88,81.289 117.302,82.711 117.425,82.711 v1(117.596,82.54) ; v1(116.356,55.694) 116.393,55.656 v1(116.393,53.972) ; v1(117.095,81.615) 117.095,68.07 v1(117.375,67.789) ; v1(117.687,93.676) 120.061,96.051 120.061,98.408 120.725,99.072 120.725,99.835 121.146,100.255 121.909,100.255 v1(121.909,101.898) ; v1(118.12,81.494) 118.873,80.741 v1(118.873,77.35) 119.575,77.349 124.334,72.591 124.334,69.786 ; 119.452,69.786 120.312,70.646 v1(120.312,75.752) ; v1(120.774,103.054) 120.606,103.054 120.606,103.032 120.255,102.681 120.214,102.681 119.478,101.944 117.747,101.944 116.999,101.195 116.999,101.002 115.967,99.97 114.365,99.97 114.012,100.323 114.012,104.223 114.316,104.527 ; 121.675,99.106 121.675,95.801 119.712,93.838 119.712,87.944 123.025,84.631 128.932,84.631 129.766,85.465 129.766,88.799 v1(128.703,89.862) ; v1(123.182,99.656) 123.197,99.671 v1(123.197,104.961) 122.942,105.216 122.942,108.561 v1(123.212,108.831) ; v1(123.253,85.275) 124.91,85.275 127.25,87.615 ; v1(123.253,97.662) 124.359,97.662 126.895,100.198 126.895,100.82 v1(126.53,101.185) ; v1(123.882,106.276) 124.161,105.997 v1(124.161,100.579) ; v1(123.932,78.26) 126.312,80.64 v1(133.029,80.64) 135.71,77.959 135.71,76.391 ; v1(125.76,95.523) 126.988,95.523 v1(127.879,96.414) ; v1(127.852,90.839) 128.694,91.681 v1(128.694,93.246) ; v1(128.002,104.846) 129.662,103.186 v1(129.662,102.456) ; v1(128.192,81.642) 128.564,82.013 v1(129.561,82.013) ; v1(129.135,85.731) 127.25,87.615 ; v1(132.362,103.276) 132.362,101.702 132.362,99.953 ; v1(134.89,97.425) 132.362,99.953 ; v1(135.71,71.272) 135.71,76.391 ; v1(137.437,100.926) 139.564,98.799 v1(139.564,93.847) 139.564,89.311 v1(137.669,87.416) ; v1(138.015,74.973) 138.015,58.062 150.795,45.282 ; v1(142.92,93.422) 142.92,88.604 v1(146.389,85.135) ; v1(143.139,96.572) 143.139,94.595 v1(144.99,92.744) 144.99,89.064 v1(148.161,85.893) ; v1(148.161,91.845) 145.132,94.874 v1(145.132,97.798) 145.132,101.808 150.053,106.729 155.898,106.729 156.875,105.752 ; 148.795,45.282 149.414,45.282 150.391,44.305 151.2,44.305 151.772,44.877 151.772,71.349 ; v1(149.95,47.428) 149.95,64.702 v1(138.261,76.391) 135.71,76.391 ; 150.875,105.752 150.875,104.775 151.772,103.879 151.772,71.349 ; v1(151.759,70.607) 151.759,71.336 151.772,71.349 ; 152.795,45.282 152.795,70.581 v1(152.987,70.774) ; 154.795,45.282 160.407,50.894 v1(160.407,80.311) 160.407,91.809 v1(161.113,92.515) ; v1(157.114,71.012) 157.114,83.275 v1(158.905,85.066) 158.905,91.095 v1(159.655,91.845) ; v1(161.04,85.971) 161.04,79.422 v1(165.284,75.178) ; v1(164.305,82.599) 164.81,83.104 v1(164.81,93.987) ; 127.25,87.615 127.25,94.914 v1(127.372,95.036) v1(131.592,99.255) 132.289,99.953 132.362,99.953
  Edge.Cuts w0.254: 42.555,43.092 165.755,43.092 165.755,110.962 42.555,110.962 42.555,43.092

## Text inside footprints (layer, text, board x,y; h text height)
D1: F.Fab "K" at 83.598,105.152 h1; F.SilkS "K" at 83.598,105.152 h1
D2: F.Fab "K" at 83.598,98.242 h1; F.SilkS "K" at 83.598,98.242 h1
D3: F.Fab "K" at 83.598,92.602 h1; F.SilkS "K" at 83.598,92.602 h1
U4: F.SilkS "IN" at 54.526,61.679 h1.5 r90; F.SilkS "OUT" at 54.537,105.757 h1.5 r90
USB1: F.Fab "PCB EDGE" at 120.735,42.485 h0.8